# Altium PCB ESP32-S31-CoreBoard-1.PcbDoc (part 2 of 3)
Units mm, origin at the board's own origin, x right, y up, seen from the top; angles counter-clockwise.
Board outline 65 x 55 mm, 6 copper layers (SIG_0, GND_0, SIG_1, GND_1, PWR, SIG2), stack 1.578 mm thick; 144 components, 138 nets, 624 pads, 309 vias.
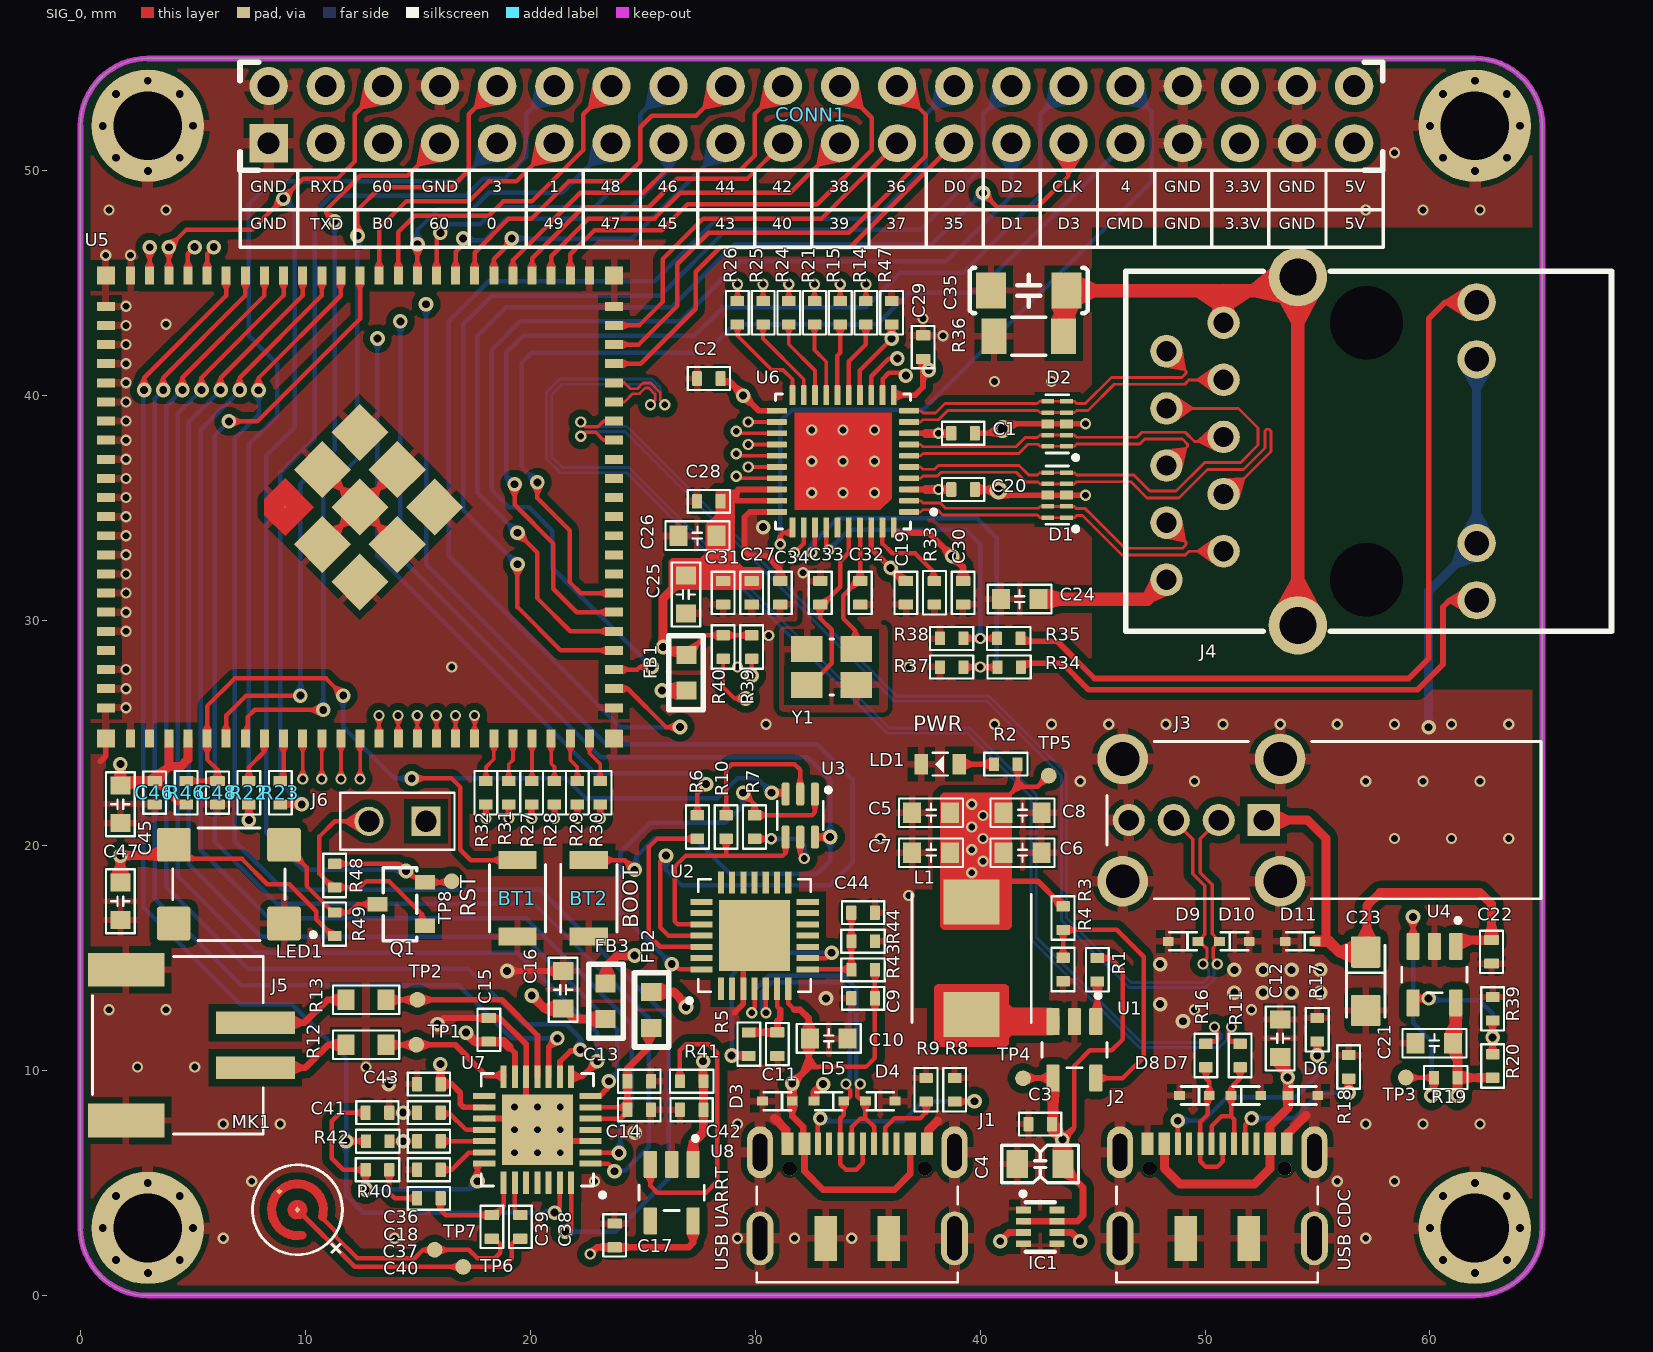
[diagram p0: SIG_0 view]

## Via types
v1: diameter 0.5, hole 0.3, SIG_0 to SIG2, tented both sides, 152 vias
v2: diameter 0.65, hole 0.35, SIG_0 to SIG2, tented both sides, 146 vias
v3: diameter 0.65, hole 0.3, SIG_0 to SIG2, tented both sides, 9 vias
v4: diameter 0.8, hole 0.45, SIG_0 to SIG2, tented both sides, 2 vias

## Nets (pads, with @x,y where several pads share a name; then routed paths per layer and width w, separated by ;. In a path a pad name is that pad's centre, name@x,y a point inside that pad or via, vN(x,y) a via of type N, cw(c..) or ccw(c..) an arc to the next point about the centre after c; other vN are vias at no path point) (continued)
GPIO50: (continued)
  SIG_0 w0.2: v2(6.604,38.862) 7.874,38.862 12.433,43.421 U5.60@12.433,45.352 ; U7.1@22.68,5.866 23.471,5.866 v2@23.749,5.588
  SIG2 w0.2: v2(6.604,38.862) 5.975,38.233 5.975,20.187 8.757,17.405 20.187,17.405 25.273,12.319 25.273,6.604 24.211,5.542 23.765,5.542 v2(23.746,5.523)
GPIO51: U5.61 U7.28 | length 64.7
  SIG_0 w0.2: v2(7.92,40.246) 7.92,40.793 11.57,44.443 11.57,45.339 U5.61@11.583,45.352 ; v2@21.59,2.794 21.82,3.024 U7.28@21.82,5.006
  SIG2 w0.2: v2(7.92,40.246) 7.92,39.162 6.858,38.1 6.858,20.193 9.017,18.034 20.447,18.034 26.162,12.319 26.162,5.207 23.797,2.842 v2(21.556,2.842)